# Altium PCB AVP32F2812_EVM_V1.0.PcbDoc (part 1 of 3)
Units mil, origin at the board's own origin, x right, y up, seen from the top; angles counter-clockwise.
Board outline 5669.29 x 3897.64 mil, 2 copper layers (Top Layer, Bottom Layer); 154 components, 189 nets, 732 pads, 469 vias.
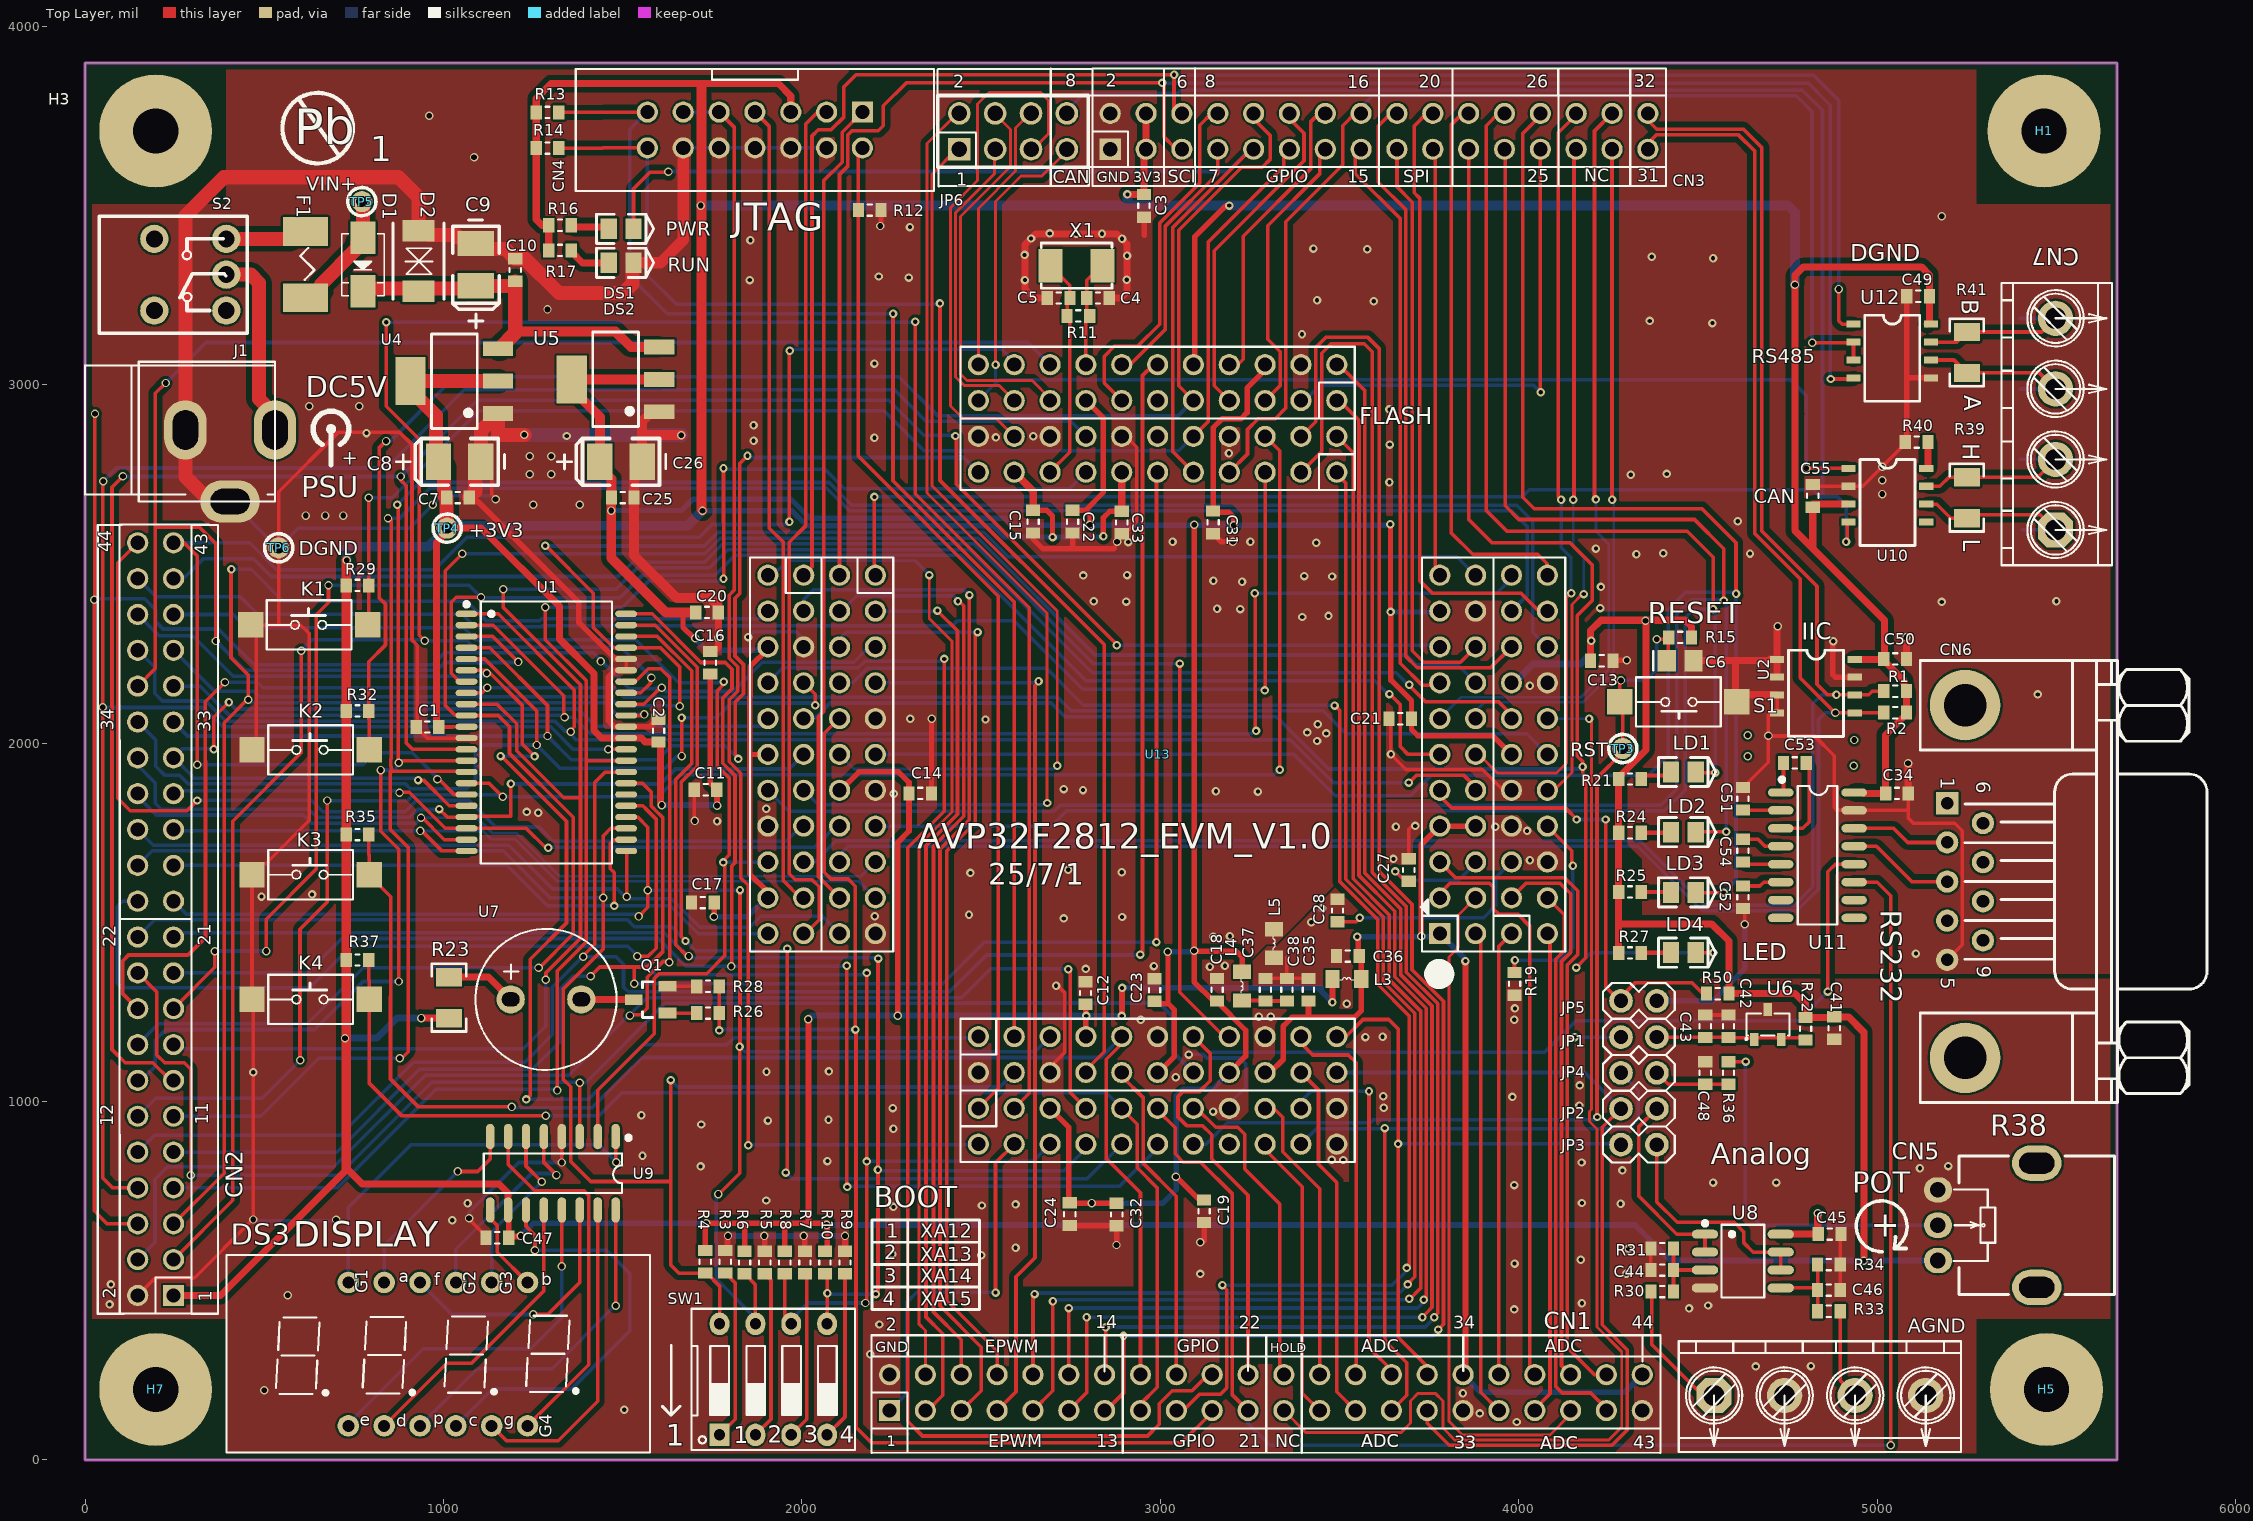
[diagram p0: Top Layer view]
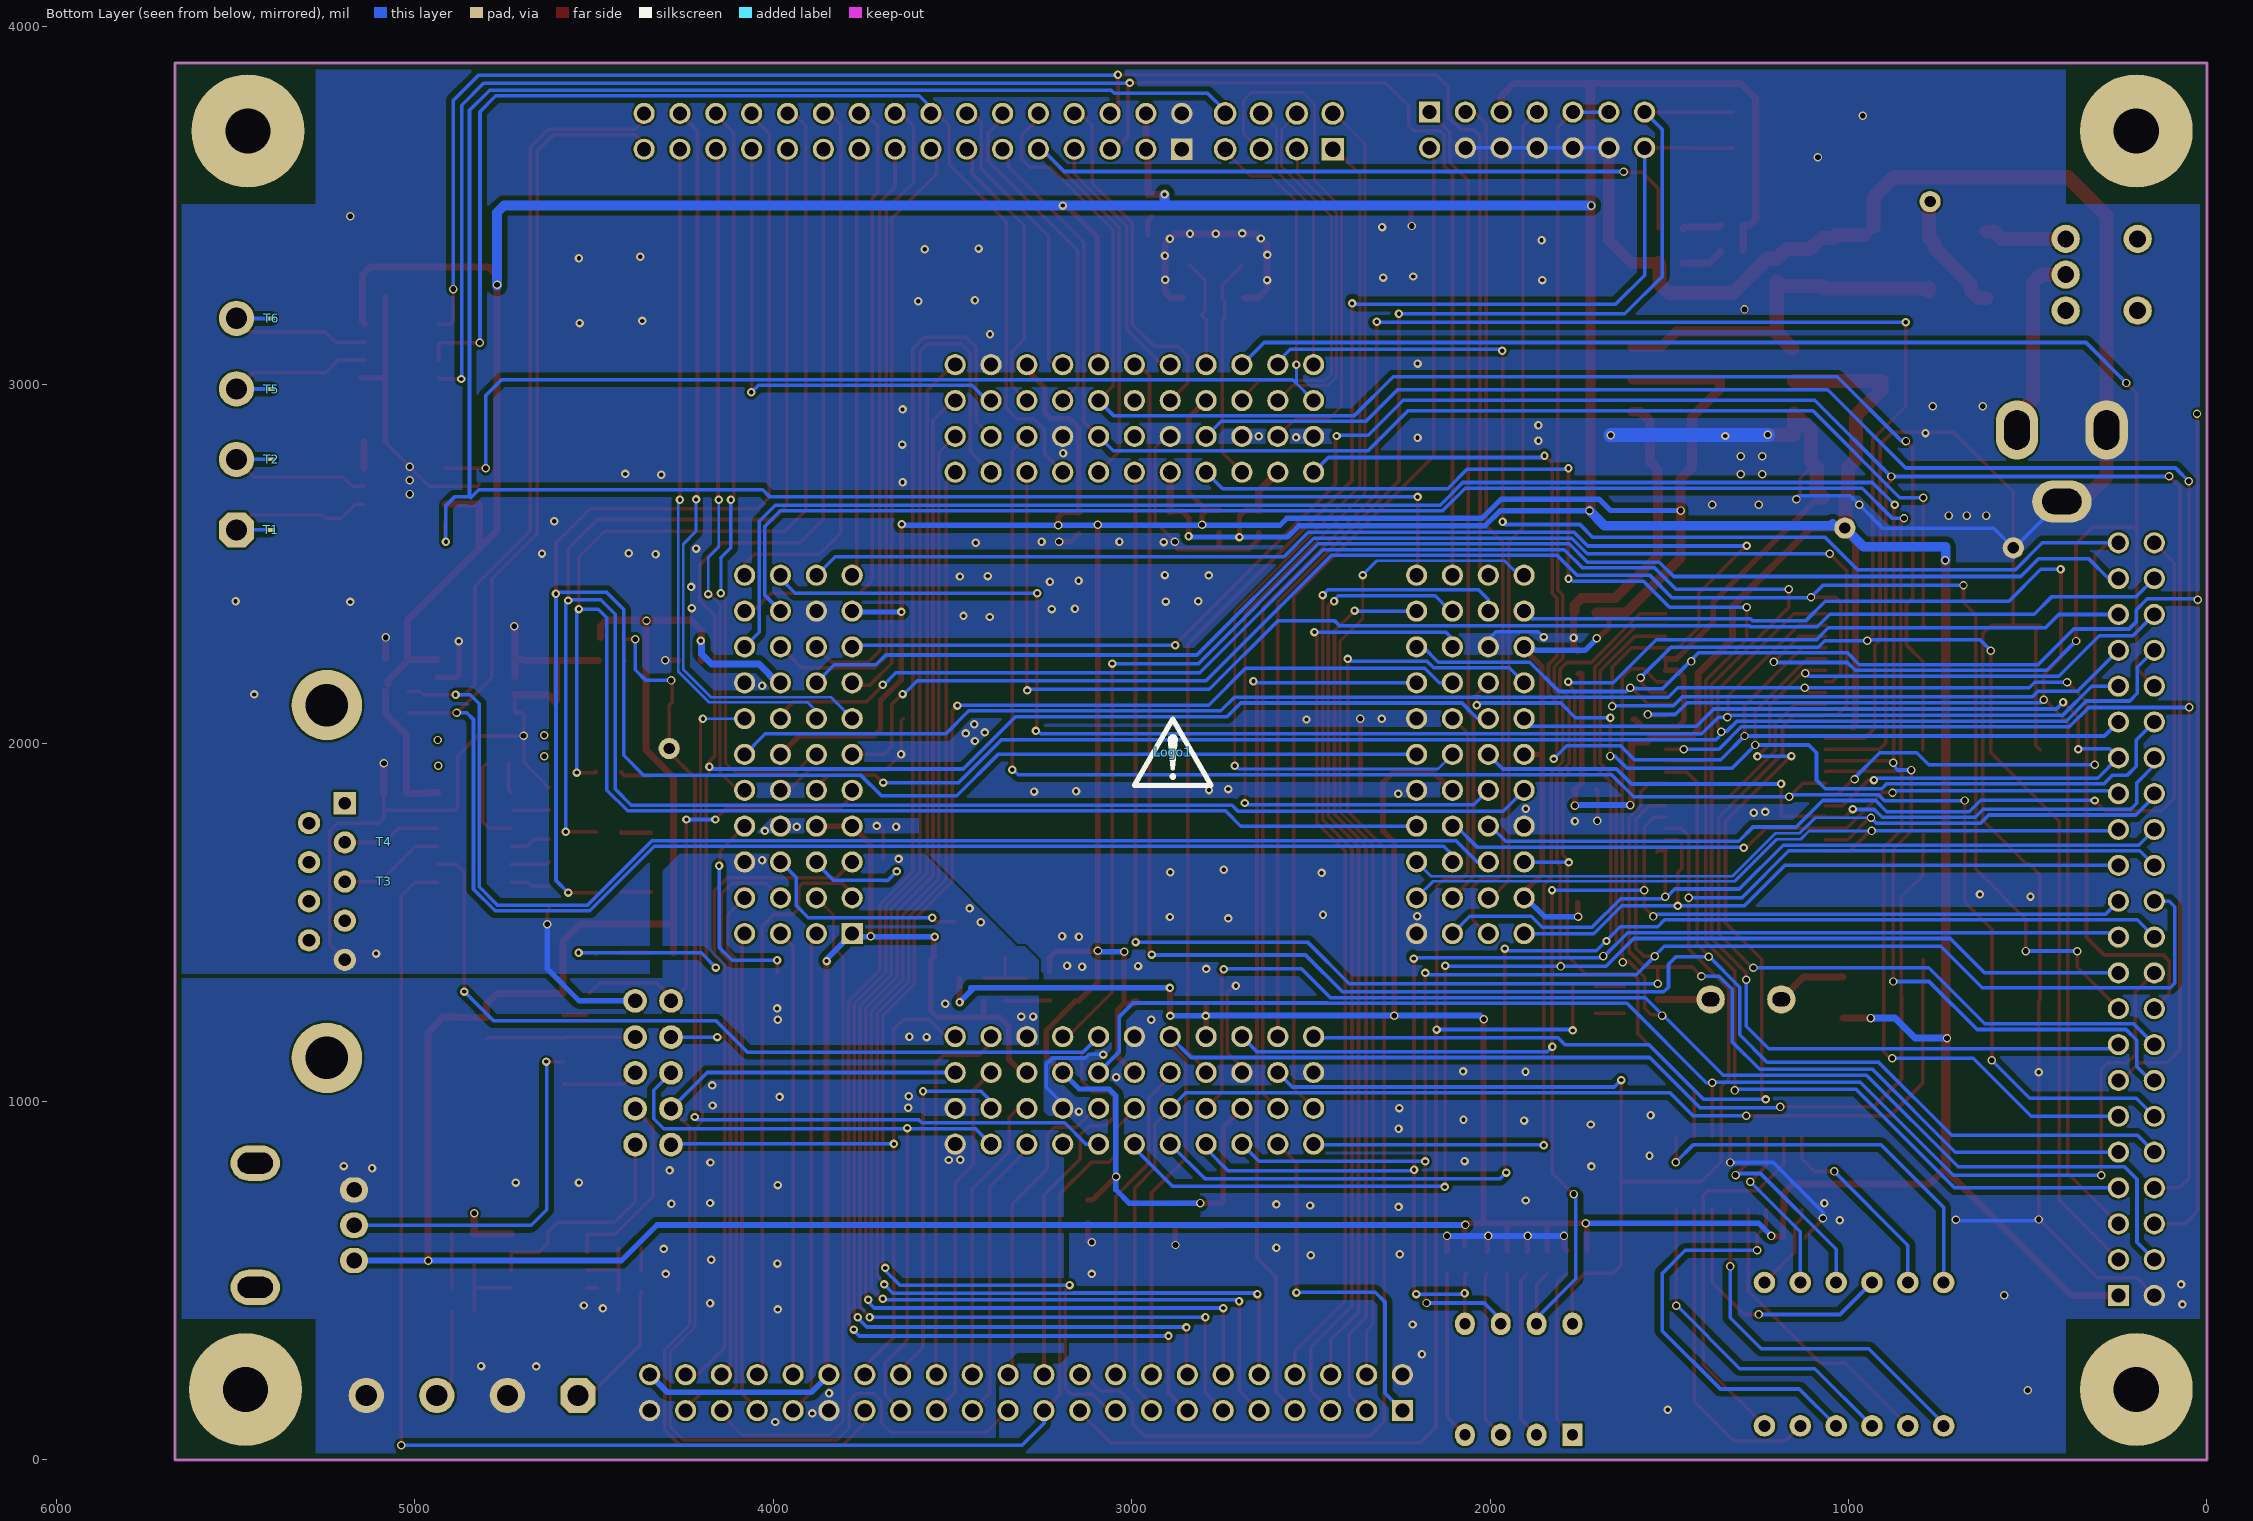
[diagram p1: Bottom Layer view, seen from below]

## Layer stack, top to bottom
Top Solder: solder mask 0.4, Solder Resist, Dk 3.5
Top Layer: signal copper 1.4
Dielectric1: core 12.6, FR-4, Dk 4.8
Bottom Layer: signal copper 1.4
Bottom Solder: solder mask 0.4, Solder Resist, Dk 3.5

## Board outline
0,892.44 0,0 672.44,0 5669.29,0 5669.29,952.44 5669.29,3897.64 4577.44,3897.64 0,3897.64 0,3067.44

## Design rules (kind name [scope] priority, off if disabled: settings)
Clearance [All] p1: gap=6 ignorepadtopadclearanceinfootprint=TRUE except(15: Arc-Fill Arc-Poly Arc-Region Track-Fill Track-Poly Track-Region)
ComponentClearance [All] p1: gap=0 collisioncheckmode=3 verticalgap=0 showdistances=FALSE
FabricationTestPointUsage TestPointUsage [All] p1: valid=0 allowmultiple=FALSE
FabricationTestpoint Testpoint [(IsPad And (OnTopLayer Or OnBottomLayer))] p1: side=3 testpointundercomponent=TRUE minsize=40 maxsize=100 preferedsize=60 minholesize=0 maxholesize=40 preferedholesize=32 testpointgrid=1 allowsidetop=TRUE allowsidebottom=TRUE usegrid=TRUE gridtolerance=0.01
PlaneConnect [All] p1: planeconnectstyle=Direct reliefexpansion=20 reliefentries=4 reliefconductorwidth=10 reliefairgap=10
PolygonConnect PolygonConnect_1 [All vs IsVia] p1: connectstyle=Direct reliefconductorwidth=10 reliefentries=4 polygonreliefangle="90 Angle" airgapwidth=10
PolygonConnect [All] p2: connectstyle=Direct reliefconductorwidth=10 reliefentries=4 polygonreliefangle="90 Angle" airgapwidth=10
RoutingVias [All] p1: holewidth=15.75 width=23.62 viastyle="Through Hole" minholewidth=11.81 minwidth=19.68 maxholewidth=39.37 maxwidth=50
SolderMaskExpansion [All] p1: expansion=4
Width [All] p1: maxlimit=100 minlimit=5 preferedwidth=10
26 further rules are at their usual default settings.

## Classes and differential pairs
component class "4.Communication Interface": C49 C50 C51 C52 C53 C54 C55 CN6 CN7 R39 R40 R41 T1 T2 T3 T4 T5 T6 U10 U11 U12
component class "3.uC Peripheral": C41 C42 C43 C44 C45 C46 C47 C48 CN5 DS3 JP1 JP2 JP3 JP4 K1 K2 K3 K4 LD1 LD2 LD3 LD4 Q1 R21 R22 R23 R24 R25 R26 R27 R28 R29 R30 R31 R32 R33 R34 R35 R36 R37 R38 U6 U7 U8 U9
component class 1.DSP: C1 C2 C3 C4 C5 C6 C27 C28 CN1 CN2 CN3 CN4 DS1 JP5 JP6 R1 R2 R3 R4 R5 R6 R7 R8 R9 R10 R11 R12 R13 R14 R15 R16 R19 R50 S1 SW1 TP3 U1 U2 U13 X1 xxxxxx
component class 2.Power: C7 C8 C9 C10 C11 C12 C13 C14 C15 C16 C17 C18 C19 C20 C21 C22 C23 C24 C25 C26 C31 C32 C33 C34 C35 C36 C37 C38 D1 D2 DS2 F1 H1 H2 H3 H4 H5 H6 H7 H8 J1 L3 L4 L5 Logo1 M1 M2 M3 R17 S2 TP4 TP5 TP6 U4 U5

## Components (designator, comment, footprint, x,y, rotation, side; value= is the part's Value field where it differs from the comment)
C1 "0.1uF/50V" C0603#1 955,2045 r180 top value=0.1uF
C2 "0.1uF/50V" C0603#1 1600,2035 r90 top value=0.1uF
C3 "0.1uF/50V" C0603#1 2954,3499 r270 top value=0.1uF
C4 "22pF/50V" "C0603 - duplicate" 2826,3242 r0 top value=100pF
C5 "22pF/50V" C0603#1 2716,3242 r0 top value=100pF
C6 "0.1uF/50V" C0805 4450,2230 r0 top value=10uF
C7 "0.1uF/50V" C0603#1 1040,2685 r0 top value=0.1uF
C8 "100uF/10V" CASE-B_3528 1045,2785 r180 top
C9 "100uF/10V" CASE-B_3528_1 1090,3335 r270 top
C10 "0.1uF/50V" C0603#1 1200,3320 r90 top value=0.1uF
C11 "0.1uF/50V" C0603#1 1731,1870 r180 top value=0.1uF
C12 "0.1uF/50V" C0603#1 2791,1303 r90 top value=0.1uF
C13 "0.1uF/50V" "C0603 - duplicate" 4231.32,2230 r0 top value=0.1uF
C14 "0.1uF/50V" C0603#1 2330,1860 r0 top value=0.1uF
C15 "0.1uF/50V" C0603#1 2645,2618 r270 top value=0.1uF
C16 "0.1uF/50V" C0603#1 1744,2224.5 r90 top value=0.1uF
C17 "0.1uF/50V" C0603#1 1723.5,1555 r180 top value=0.1uF
C18 "0.1uF/50V" C0603#1 3158,1312 r90 top value=0.1uF
C19 "0.1uF/50V" C0603#1 3122,694 r270 top value=0.1uF
C20 "0.1uF/50V" C0603#1 1735,2365 r0 top value=0.1uF
C21 "0.1uF/50V" C0603#1 3669,2068 r180 top value=0.1uF
C22 "0.1uF/50V" C0603#1 2755,2618 r270 top value=0.1uF
C23 "0.1uF/50V" C0603#1 2984,1311 r90 top value=0.1uF
C24 "0.1uF/50V" C0603#1 2747,686 r270 top value=0.1uF
C25 "0.1uF/50V" C0603#1 1500,2685 r0 top value=0.1uF
C26 "100uF/10V" CASE-B_3528_1 1495,2785 r180 top
C27 "2.2uF/25V" "C0603 - duplicate" 3693,1646 r90 top value=10uF
C28 "2.2uF/25V" "C0603 - duplicate" 3494,1533 r90 top value=10uF
C31 "2.2uF/25V" "C0603 - duplicate" 3147,2616 r270 top value=10uF
C32 "2.2uF/25V" C0603#2 2878,685 r270 top value=0.1uF
C33 "2.2uF/25V" C0603#1 2892,2615.5 r270 top value=10uF
C34 "2.2uF/25V" C0603#2 5055,1860 r0 top value=0.1uF
C35 "2.2uF/25V" C0603#2 3413,1312 r90 top value=10uF
C36 "2.2uF/25V" C0603#2 3523,1406 r180 top value=0.1uF
C37 "2.2uF/25V" C0603#2 3293,1312 r90 top value=10uF
C38 "2.2uF/25V" C0603#2 3353,1312 r90 top value=0.1uF
C41 "0.1uF/50V" C0603#2 4880,1205 r90 top value=1uF
C42 "0.1uF/50V" C0603#2 4585,1210 r270 top value=0.1uF
C43 "0.1uF/50V" C0603#2 4520,1210 r270 top value=10uF
C44 "0.1uF/50V" C0603#2 4400,530 r0 top value=0.1uF
C45 "0.1uF/50V" C0603#2 4867.18,630.19 r180 top value=0.1uF
C46 "0.1uF/50V" "C0603 - duplicate" 4865,474 r180 top value=0.1uF
C47 "0.1uF/50V" C0603#2 1150,620 r180 top value=0.1uF
C48 "0.1uF/50V" C0603#2 4520,1080 r90 top value=0.1uF
C49 "0.1uF/50V" C0603#2 5114,3247 r180 top value=0.1uF
C50 "0.1uF/50V" C0603#2 5050,2235 r0 top value=0.1uF
C51 "0.1uF/50V" C0603#2 4625,1845 r90 top value=0.1uF
C52 "0.1uF/50V" C0603#2 4625,1570 r270 top value=0.1uF
C53 "0.1uF/50V" C0603#2 4770,1945 r0 top value=0.1uF
C54 "0.1uF/50V" C0603#2 4625,1700 r270 top value=0.1uF
C55 "0.1uF/50V" "C0603 - duplicate" 4820,2690 r90 top value=0.1uF
CN1 "2.54-2X22P 排针" IDC2X22 2244.44,138 r0 top
CN2 "2.54-2X22P 排针" IDC2X22 246.61,459.05 r90 top
CN3 "2.54-2X16P 排针" IDC2X16 2860,3657 r0 top
CN4 "2.54-2X7P 简易牛角母座" IDC14-L 1968.5,3710 r180 top value=2.54-2X7P
CN5 "KF301-4P-5.08" J-DG128-4 4840,180 r0 top
CN6 "DB9" db9 5245,1614.17 r0 top
CN7 "KF301-4P-5.08" J-DG128-4 5497.33,2890.06 r90 top
D1 "SS14" SMA 775,3335.2 r90 top
D2 "SMBJ6.8CA" SMB2 930,3345 r270 top
DS1 "LED" SMD_LED0805_LED 1495.55,3435 r180 top
DS2 "黄色LED" SMD_LED0805_LED_1 1495.55,3340 r180 top
DS3 "FJ3461AH" 0.36X4 984.25,295.28 r0 top value=0.36×4
F1 "1.5A/24V" 1812_PTC_NP 615,3335 r270 top
H1 "M3*12+6" "NY PMS 440 0025 PH" 4993.15,3708.23 r0 top
H3 "M3*12+6" "NY PMS 440 0025 PH_1"#1 -275.59,3708.23 r0 top
H5 "M3*12+6" "NY PMS 440 0025 PH" 5000,196.85 r0 top
H7 "M3*12+6" "NY PMS 440 0025 PH_1"#2 196.85,669.29 r90 top
J1 "DC-005-20A" DC-005 529.58,2874.02 r0 top
JP1 "XH2.54-2P" SIP2C_1_1 4335,1180 r180 top
JP2 "XH2.54-2P" SIP2C 4335,980 r180 top
JP3 "XH2.54-2P" SIP2C_1 4335,880 r180 top
JP4 "XH2.54-2P" SIP2C 4335,1080 r180 top
JP5 "XH2.54-2P" SIP2C 4335,1281 r0 top
JP6 "2.54-2X7P 简易牛角母座" HDR-TH_8P-P2.54-V-F-R2-C4-S2.54 2589,3707 r0 top
K1 "1TS002B-2400-5001-CT" SW-3X6 625,2330 r0 top value=1TS002B
K2 "1TS002B-2400-5001-CT" SW-3X6 628.79,1981.24 r0 top value=1TS002B
K3 "1TS002B-2400-5001-CT" SW-3X6 628.79,1633.12 r0 top value=1TS002B
K4 "1TS002B-2400-5001-CT" SW-3X6 628.79,1285 r0 top value=1TS002B
L3 "BLM21PG221SN" L-0805_1_1 3520,1342 r0 top value=220Ω@100MHZ
L4 "BLM21PG221SN" L-0805 3228,1322 r270 top value=220Ω@100MHZ
L5 "BLM21PG221SN" L-0805_1 3317,1441 r270 top value=220Ω@100MHZ
LD1 "Red" SMD_LED0805_LED_1 4459.13,1919.57 r180 top
LD2 "Red" SMD_LED0805_LED 4459.13,1751.59 r180 top
LD3 "Red" SMD_LED0805_LED 4459.13,1583.61 r180 top
LD4 "Red" SMD_LED0805_LED 4459.13,1415.63 r180 top
Logo1 "CAUTION.  READ USER GUIDE BEFORE USE" IEC_Caution_Small 2885,1975 r180 bottom
Q1 "2N7002K" MOS-SOT23 1577.83,1284.17 r90 top
R1 "2.2KΩ" R0603#1 5050,2145 r0 top value=1K
R2 "2.2KΩ" R0603#1 5050,2085 r0 top value=1K
R3 "1KΩ" R0603#1 1786,553 r270 top value=1K
R4 "10KΩ" "R0603 - duplicate" 1730,553 r90 top value=1K
R5 "1KΩ" R0603#1 1896,551 r270 top value=1K
R6 "10KΩ" R0603#1 1840,551 r90 top value=1K
R7 "1KΩ" R0603#1 2008,551 r270 top value=1K
R8 "10KΩ" R0603#1 1952,551 r90 top value=1K
R9 "1KΩ" R0603#1 2120,551 r270 top value=1K
R10 "10KΩ" R0603#1 2064,551 r90 top value=1K
R11 "1MΩ" R0603#2 2771,3192 r180 top value=1K
R12 "2.2KΩ" R0603#2 2189,3487 r180 top value=1K
R13 "10KΩ" R0603#1 1290,3760 r0 top value=1K
R14 "10KΩ" R0603#1 1290,3660 r0 top value=1K
R15 "10KΩ" R0603#1 4450,2295 r180 top value=1K
R16 "10KΩ" R0603#1 1325,3445 r0 top value=1K
R17 "1KΩ" R0603#1 1325,3375 r0 top value=1K
R19 "20K" "R0603 - duplicate" 3988,1328.5 r90 top value=1K
R21 "1KΩ" "R0603 - duplicate" 4310,1900 r180 top value=1K
R22 "470R" R0603#1 4800,1203 r270 top value=1K
R23 "22R" 1206RX 1015,1290 r90 top value=1K
R24 "1KΩ" R0603#2 4310,1750 r180 top value=1K
R25 "1KΩ" R0603#2 4310,1585 r180 top value=1K
R26 "1KΩ" R0603#1 1737.91,1246.77 r0 top value=1K
R27 "1KΩ" R0603#2 4310,1415 r180 top value=1K
R28 "4.7KΩ" "R0603 - duplicate" 1737.91,1321.57 r180 top value=1K
R29 "10KΩ" R0603#2 760,2440 r0 top value=1K
R30 "30KΩ" "R0603 - duplicate" 4400,470 r0 top value=1K
R31 "10KΩ" R0603#2 4400,590 r180 top value=1K
R32 "10KΩ" R0603#1 760,2090 r0 top value=1K
R33 "30KΩ" R0603#1 4865,415 r180 top value=1K
R34 "10KΩ" "R0603 - duplicate" 4865,545 r0 top value=1K
R35 "10KΩ" R0603#1 760,1745 r0 top value=1K
R36 "1KΩ" R0603#1 4585,1080 r270 top value=1K
R37 "10KΩ" R0603#1 760,1395 r0 top value=1K
R38 "RK09K1130A6S  10KΩ" RK09K1130 5445,655 r270 top
R39 "120R" 1206RX 5250,2685 r90 top
R40 "10KΩ" R0603#1 5110,2840 r0 top value=1K
R41 "120R" 1206RX 5250,3090 r90 top value=1K
R50 "10K" R0603#1 4555,1301 r180 top
S1 "1TS002B-2400-5001-CT" SW-3X6 4445,2115 r180 top value=1TS002B
S2 "SMTS-102C3" SW2 393.7,3307.09 r0 top
SW1 "DS-04RP" DIP-KEY-4 1692.05,28.23 r0 top
T1 "SPARK_GAP" SPARK_GAP#1 5380.33,2594.79 r90 bottom locked
T2 "SPARK_GAP" SPARK_GAP#1 5379.33,2791.64 r90 bottom locked
T3 "SPARK_GAP" SPARK_GAP#2 5085,1615 r90 bottom locked
T4 "SPARK_GAP" SPARK_GAP#2 5085,1725 r90 bottom
T5 "SPARK_GAP" SPARK_GAP#1 5379.33,2988 r90 bottom locked
T6 "SPARK_GAP" SPARK_GAP#1 5379.33,3184.85 r90 bottom locked
TP3 "RST" TEST-0.8/1.5MM 4290,1985 r0 top
TP4 "+3V3" TEST-0.8/1.5MM 1010,2600 r0 top
TP5 "VIN+" TEST-0.8/1.5MM 772,3511 r0 top
TP6 "DGND" TEST-0.8/1.5MM 540,2545 r0 top
U1 "IS61LV25616AL-10TLI" TSOP-44_L18.4-W10.2-P0.80-LS11.8-BL 1286.74,2030 r270 top
U2 "AT24C02D-SSHM-T" SO-8 4829,2159 r0 top
U4 "AMS1117-3.3V" SOT-223 1030,3010 r90 top
U5 "AMS1117-1.8V" SOT-223_1 1480,3015 r90 top
U6 "TL431_C963380" SOT-23-3_L2.9-W1.4-P1.90-LS2.6-BR 4695,1215 r270 top
U7 "Cy-9650-3029" SUN-0905-3V 1285.81,1285 r0 top
U8 "LM358_C5252902" SOP-8_L4.9-W3.9-P1.27-LS6.0-BL 4625,555 r270 top
U9 "AIP650" SOIC-16_150mil 1305,800 r180 top
U10 "SN65HVD230D" SO-8 5028.48,2691.8 r0 top
U11 "SP3232EEN" SOIC-16_150mil_1 4833.15,1687.28 r270 top
U12 "SP3485EN-L/TR" SO-8 5042,3094 r0 top
U13 "ADP32F2812" AVP32F335 2992.13,1968.5 r180 top locked
X1 "YSX530GA 10MHZ 20pF 10ppm" XTAL_5032 2766,3332 r0 top value=30MHZ

## Footprints (in the part's own frame and the unit in brackets; to place one, negate y for a bottom-side part, rotate by r counter-clockwise, add the part's x,y. Pads: shape width x height; smd on the part's side, far side on the other; paste and mask are expansions set on the pad)
0.36X4 [mil] "4位0.36寸数码管"
  round 60 hole 33.46: a(-150,200) b(250,200) c(50,-200) com1(-250,200) com2(50,200) com3(150,200) com4(250,-200) d(-150,-200) dp(-50,-200) e(-250,-200) f(-50,200) g(150,-200)
  silkscreen extent -590,-275 592,276, body extent -591,-276 591,276, height 283
1206RX [mm]
  rect 1.3x1.85 smd: 1(-1.45,0) 2(1.45,0)
  silkscreen extent -2.4,-1.21 2.4,1.21, body extent -1.57,-0.8 1.63,0.8, height 0.6
1812_PTC_NP [mil]
  rect 80x125 smd: 1(-92.5,0) 2(92.5,0)
  silkscreen extent -47,-15 42,25, body extent -84,-63 94,63, height 20
AVP32F335 [mm]
  rect 1.5x1.5 hole 1: 1(-20,12.7)
  round 1.5 hole 1: 2(-22.54,12.7) 3(-25.08,12.7) 4(-27.62,12.7) 5(-20,10.16) 6(-22.54,10.16) 7(-25.08,10.16) 8(-27.62,10.16) 9(-20,7.62) 10(-22.54,7.62) 11(-25.08,7.62) 12(-27.62,7.62) 13(-20,5.08) 14(-22.54,5.08) 15(-25.08,5.08) 16(-27.62,5.08) 17(-20,2.54) 18(-22.54,2.54) 19(-25.08,2.54) 20(-27.62,2.54) 21(-20,0) 22(-22.54,0) 23(-25.08,0) 24(-27.62,0) 25(-20,-2.54) 26(-22.54,-2.54) 27(-25.08,-2.54) 28(-27.62,-2.54) 29(-20,-5.08) 30(-22.54,-5.08) 31(-25.08,-5.08) 32(-27.62,-5.08) 33(-20,-7.62) 34(-22.54,-7.62) 35(-25.08,-7.62) 36(-27.62,-7.62) 37(-20,-10.16) 38(-22.54,-10.16) 39(-25.08,-10.16) 40(-27.62,-10.16) 41(-20,-12.7) 42(-22.54,-12.7) 43(-25.08,-12.7) 44(-27.62,-12.7) 45(-12.7,-20) 46(-12.7,-22.54) 47(-12.7,-25.08) 48(-12.7,-27.62) 49(-10.16,-20) 50(-10.16,-22.54) 51(-10.16,-25.08) 52(-10.16,-27.62) 53(-7.62,-20) 54(-7.62,-22.54) 55(-7.62,-25.08) 56(-7.62,-27.62) 57(-5.08,-20) 58(-5.08,-22.54) 59(-5.08,-25.08) 60(-5.08,-27.62) 61(-2.54,-20) 62(-2.54,-22.54) 63(-2.54,-25.08) 64(-2.54,-27.62) 65(0,-20) 66(0,-22.54) 67(0,-25.08) 68(0,-27.62) 69(2.54,-20) 70(2.54,-22.54) 71(2.54,-25.08) 72(2.54,-27.62) 73(5.08,-20) 74(5.08,-22.54) 75(5.08,-25.08) 76(5.08,-27.62) 77(7.62,-20) 78(7.62,-22.54) 79(7.62,-25.08) 80(7.62,-27.62) 81(10.16,-20) 82(10.16,-22.54) 83(10.16,-25.08) 84(10.16,-27.62) 85(12.7,-20) 86(12.7,-22.54) 87(12.7,-25.08) 88(12.7,-27.62) 89(20,-12.7) 90(22.54,-12.7) 91(25.08,-12.7) 92(27.62,-12.7) 93(20,-10.16) 94(22.54,-10.16) 95(25.08,-10.16) 96(27.62,-10.16) 97(20,-7.62) 98(22.54,-7.62) 99(25.08,-7.62) 100(27.62,-7.62) 101(20,-5.08) 102(22.54,-5.08) 103(25.08,-5.08) 104(27.62,-5.08) 105(20,-2.54) 106(22.54,-2.54) 107(25.08,-2.54) 108(27.62,-2.54) 109(20,0) 110(22.54,0) 111(25.08,0) 112(27.62,0) 113(20,2.54) 114(22.54,2.54) 115(25.08,2.54) 116(27.62,2.54) 117(20,5.08) 118(22.54,5.08) 119(25.08,5.08) 120(27.62,5.08) 121(20,7.62) 122(22.54,7.62) 123(25.08,7.62) 124(27.62,7.62) 125(20,10.16) 126(22.54,10.16) 127(25.08,10.16) 128(27.62,10.16) 129(20,12.7) 130(22.54,12.7) 131(25.08,12.7) 132(27.62,12.7) 133(12.7,20) 134(12.7,22.54) 135(12.7,25.08) 136(12.7,27.62) 137(10.16,20) 138(10.16,22.54) 139(10.16,25.08) 140(10.16,27.62) 141(7.62,20) 142(7.62,22.54) 143(7.62,25.08) 144(7.62,27.62) 145(5.08,20) 146(5.08,22.54) 147(5.08,25.08) 148(5.08,27.62) 149(2.54,20) 150(2.54,22.54) 151(2.54,25.08) 152(2.54,27.62) 153(0,20) 154(0,22.54) 155(0,25.08) 156(0,27.62) 157(-2.54,20) 158(-2.54,22.54) 159(-2.54,25.08) 160(-2.54,27.62) 161(-5.08,20) 162(-5.08,22.54) 163(-5.08,25.08) 164(-5.08,27.62) 165(-7.62,20) 166(-7.62,22.54) 167(-7.62,25.08) 168(-7.62,27.62) 169(-10.16,20) 170(-10.16,22.54) 171(-10.16,25.08) 172(-10.16,27.62) 173(-12.7,20) 174(-12.7,22.54) 175(-12.7,25.08) 176(-12.7,27.62)
  silkscreen extent -28.89,-28.89 28.89,28.89
C0603#1 [mm] "无丝印       D=1.6"
  rect 0.8x1 smd mask+0.051: 1(-0.8,0) 2(0.8,0)
  silkscreen extent -0.15,-0.4 0.15,0.4, body extent -0.71,-0.38 0.81,0.38, height 0.68
C0603#2 [mm] "无丝印       D=1.6"
  rect 0.8x1 smd: 1(-0.8,0) 2(0.8,0)
  silkscreen extent -0.15,-0.4 0.15,0.4, body extent -0.71,-0.38 0.81,0.38, height 0.68
"C0603 - duplicate" [mm] "无丝印       D=1.6"
  rect 0.8x1 smd mask+0.051: 1(-0.8,0) 2(0.8,0)
  silkscreen extent -0.15,-0.4 0.15,0.4, body extent -0.71,-0.38 0.81,0.38, height 0.68
C0805 [mm] "Chip Capacitor; Body 2.0 x 1.2 mm (LxW typ)"
  rect 1.3x1.5 smd: 1(-0.95,0) 2(0.95,0)
  silkscreen extent -1.9,-0.65 -1.9,0.65
CASE-B_3528 [mm]
  rect 1.8x2.6 smd: 1(1.5,0) 2(-1.5,0)
  silkscreen extent -3.18,-1.65 4.5,1.65, body extent -1.85,-1.47 1.85,1.46, height 2.03
CASE-B_3528_1 [mm]
  rect 1.8x2.6 smd: 1(1.5,0) 2(-1.5,0)
  silkscreen extent -3.18,-1.65 4.5,1.65, body extent -1.85,-1.47 1.85,1.46, height 2.03
db9 [mil]
  round 196.67 hole 118.33: 0(0,-492.08) 0(0,492.08)
  rect 62x62 hole 35: 1(-50,217.92)
  round 62 hole 35: 2(-50,108.75) 3(-50,-0.42) 4(-50,-109.58) 5(-50,-218.75) 6(50,162.92) 7(50,53.75) 8(50,-55.42) 9(50,-164.58)
  silkscreen extent -125,-617 675,616, body extent -108,-601 550,600, height 124
DC-005 [mm] "接口大小9X11MM    5.5-2.1mm  孔径1.8/2.8"
  oval 3x4.2 hole 1.8 slot 2.8 at 90 deg: 1(0,0) 3(-6.35,0)
  oval 4.2x3 hole 1.8 slot 2.8 at 0 deg: 2(-3.175,-5.08)
  silkscreen extent -13.46,-5.08 0,4.83, body extent -13.7,-5.02 0.45,4.56, height 11
DIP-KEY-4 [mm]
  rect 1.4x1.6 hole 0.8: 1(1.98,1.065)
  oval 1.4x1.6 hole 0.8: 2(4.52,1.065) 3(7.06,1.065) 4(9.6,1.065) 5(9.6,8.935) 6(7.06,8.935) 7(4.52,8.935) 8(1.98,8.935)
  silkscreen extent 0,0 11.58,10, body extent -0.05,-0.08 6.55,10.08, height 6.9
HDR-TH_8P-P2.54-V-F-R2-C4-S2.54 [mm]
  rect 1.6x1.6 hole 1.1: 1(-3.81,-1.27)
  round 1.6 hole 1.1: 2(-3.81,1.27) 3(-1.27,-1.27) 4(-1.27,1.27) 5(1.27,-1.27) 6(1.27,1.27) 7(3.81,-1.27) 8(3.81,1.27)
  silkscreen extent -5.33,-2.54 5.33,2.54
IDC2X16 [mm] "2.54X40P双排插针"
  rect 1.5x1.5 hole 1: 1(0,0)
  round 1.5 hole 1: 2(0,2.54) 3(2.54,0) 4(2.54,2.54) 5(5.08,0) 6(5.08,2.54) 7(7.62,0) 8(7.62,2.54) 9(10.16,0) 10(10.16,2.54) 11(12.7,0) 12(12.7,2.54) 13(15.24,0) 14(15.24,2.54) 15(17.78,0) 16(17.78,2.54) 17(20.32,0) 18(20.32,2.54) 19(22.86,0) 20(22.86,2.54) 21(25.4,0) 22(25.4,2.54) 23(27.94,0) 24(27.94,2.54) 25(30.48,0) 26(30.48,2.54) 27(33.02,0) 28(33.02,2.54) 29(35.56,0) 30(35.56,2.54) 31(38.1,0) 32(38.1,2.54)
  silkscreen extent -1.27,-1.27 39.4,3.82, body extent -1.23,-1.23 39.4,3.82, height 8.4
IDC2X22 [mm] "2.54X40P双排插针"
  rect 1.5x1.5 hole 1: 1(0,0)
  round 1.5 hole 1: 2(0,2.54) 3(2.54,0) 4(2.54,2.54) 5(5.08,0) 6(5.08,2.54) 7(7.62,0) 8(7.62,2.54) 9(10.16,0) 10(10.16,2.54) 11(12.7,0) 12(12.7,2.54) 13(15.24,0) 14(15.24,2.54) 15(17.78,0) 16(17.78,2.54) 17(20.32,0) 18(20.32,2.54) 19(22.86,0) 20(22.86,2.54) 21(25.4,0) 22(25.4,2.54) 23(27.94,0) 24(27.94,2.54) 25(30.48,0) 26(30.48,2.54) 27(33.02,0) 28(33.02,2.54) 29(35.56,0) 30(35.56,2.54) 31(38.1,0) 32(38.1,2.54) 33(40.64,0) 34(40.64,2.54) 35(43.18,0) 36(43.18,2.54) 37(45.72,0) 38(45.72,2.54) 39(48.26,0) 40(48.26,2.54) 41(50.8,0) 42(50.8,2.54) 43(53.34,0) 44(53.34,2.54)
  silkscreen extent -1.27,-1.27 54.64,3.82, body extent -1.23,-1.23 54.69,3.85, height 8.4
IDC14-L [mm]
  rect 1.5x1.5 hole 1: 1(-5.084,-1.29)
  round 1.5 hole 1: 2(-5.084,1.25) 3(-2.544,-1.29) 4(-2.544,1.25) 5(-0.004,-1.29) 6(-0.004,1.25) 7(2.536,-1.29) 8(2.536,1.25) 9(5.076,-1.29) 10(5.076,1.25) 11(7.616,-1.29) 12(7.616,1.25) 13(10.156,-1.29) 14(10.156,1.25)
  silkscreen extent -10.16,-4.34 15.24,4.3, body extent -10.18,-4.47 15.26,4.65, height 9.1
IEC_Caution_Small [mil]
  silkscreen extent -107,-93 107,92
J-DG128-4 [mm]
  oct 2.5x2.5 hole 1.5: 1(-7.5,0)
  round 2.5 hole 1.5: 2(-2.5,0) 3(2.5,0) 4(7.5,0)
  silkscreen extent -10,-4 10,3.84, body extent -10,-3.59 10,3.91, height 10
L-0805 [mil] "标准型  间距40mil 电感"
  rect 40x50 smd: 1(-40,0) 2(40,0)
  silkscreen extent -20,-3 19,3, body extent -39,-26 39,24, height 36
L-0805_1 [mil] "标准型  间距40mil 电感"
  rect 40x50 smd: 1(-40,0) 2(40,0)
  silkscreen extent -20,-3 19,3, body extent -39,-26 39,24, height 36
L-0805_1_1 [mil] "标准型  间距40mil 电感"
  rect 40x50 smd: 1(-40,0) 2(40,0)
  silkscreen extent -20,-3 19,3, body extent -39,-26 39,24, height 36
MOS-SOT23 [mm] "焊盘加长型"
  rect 0.762x1.27 smd: D(0,1.2) G(-0.95,-1.2) S(0.95,-1.2)
  silkscreen extent -1.27,-0.15 1.27,0.58, body extent -1.45,-1.5 1.45,1.3, height 1.2
"NY PMS 440 0025 PH" [mm] "4-40 nylon screw and mounting hole"
  round 8 hole 3.2: 1(12,0)
"NY PMS 440 0025 PH_1"#1 [mm] "4-40 nylon screw and mounting hole"
  round 8 hole 3.2: 1(12,0)
"NY PMS 440 0025 PH_1"#2 [mm] "4-40 nylon screw and mounting hole"
  round 8 hole 3.2: 1(-12,0)
R0603#1 [mm] "无丝印 脚距1.6mm  0.8/1mm 焊盘"
  rect 0.8x1 smd mask+0.051: 1(-0.8,0) 2(0.8,0)
  silkscreen extent -0.15,-0.4 0.15,0.4, body extent -0.79,-0.4 0.81,0.4, height 0.43
R0603#2 [mm] "无丝印 脚距1.6mm  0.8/1mm 焊盘"
  rect 0.8x1 smd: 1(-0.8,0) 2(0.8,0)
  silkscreen extent -0.15,-0.4 0.15,0.4, body extent -0.79,-0.4 0.81,0.4, height 0.43
"R0603 - duplicate" [mm] "无丝印 脚距1.6mm  0.8/1mm 焊盘"
  rect 0.8x1 smd mask+0.051: 1(-0.8,0) 2(0.8,0)
  silkscreen extent -0.15,-0.4 0.15,0.4, body extent -0.79,-0.4 0.81,0.4, height 0.43
RK09K1130 [mm] "立式可调电位器"
  oval 2.5x3.5 hole 1.5 slot 2.5 at 90 deg: 0(-4.4,0) 0(4.4,0)
  oval 1.8x2 hole 1.1: 1(-2.5,-7) 2(0,-7) 3(2.5,-7)
  silkscreen extent -4.9,-5.88 4.9,5.5, body extent -5.7,-7.15 5.7,5.5, height 19.5
SIP2C [mil] "带短路帽"
  round 66 hole 40 paste-4: 1(-50,0) 2(50,0)
  silkscreen extent -100,-50 100,50, body extent -100,-52 100,50, height 344
SIP2C_1 [mil] "带短路帽"
  round 66 hole 40: 1(-50,0) 2(50,0)
  silkscreen extent -100,-50 100,50, body extent -100,-52 100,50, height 344
SIP2C_1_1 [mil] "带短路帽"
  round 66 hole 40 paste-4: 1(-50,0) 2(50,0)
  silkscreen extent -100,-50 100,50, body extent -100,-52 100,50, height 344
SMA [mm] "DO-214AC"
  rect 2.3x1.75 smd: 1(1.9,0) 2(-1.9,0)
  silkscreen extent -2.2,-1.5 2.2,1.5, body extent -2.3,-1.37 2.3,1.33, height 2.4
SMB2 [mm] "双向TVS"
  rect 1.52x2.3 smd: 1(-2.14,0) 2(2.14,0)
  silkscreen extent -2.7,-1.8 2.7,1.8, body extent -2.7,-1.8 2.7,1.8, height 2.3
SMD_LED0805_LED [mm]
  rect 1.16x1.47 smd: 1(0.875,0) 2(-0.875,0)
  silkscreen extent -2.3,-1.04 1.76,1.03, body extent -1.01,-0.62 1.01,0.62, height 1.1
SMD_LED0805_LED_1 [mm]
  rect 1.16x1.47 smd: 1(0.875,0) 2(-0.875,0)
  silkscreen extent -2.3,-1.04 1.76,1.03, body extent -1.01,-0.62 1.01,0.62, height 1.1
SO-8 [mm]
  rect 1x0.5 smd: 1(-2.75,1.905) 2(-2.75,0.635) 3(-2.75,-0.635) 4(-2.75,-1.905) 5(2.75,-1.905) 6(2.75,-0.635) 7(2.75,0.635) 8(2.75,1.905)
  silkscreen extent -1.95,-3.56 1.95,2.54
SOIC-16_150mil [mm]
  oval 0.6x1.8 smd: 1(-4.445,-2.6) 2(-3.175,-2.6) 3(-1.905,-2.6) 4(-0.635,-2.6) 5(0.635,-2.6) 6(1.905,-2.6) 7(3.175,-2.6) 8(4.445,-2.6) 9(4.445,2.6) 10(3.175,2.6) 11(1.905,2.6) 12(0.635,2.6) 13(-0.635,2.6) 14(-1.905,2.6) 15(-3.175,2.6) 16(-4.445,2.6)
  silkscreen extent -5.51,-2.66 4.9,1.4, body extent -5,-2.8 4.98,3.11, height 1.45
SOIC-16_150mil_1 [mm]
  oval 0.6x1.8 smd: 1(-4.445,-2.6) 2(-3.175,-2.6) 3(-1.905,-2.6) 4(-0.635,-2.6) 5(0.635,-2.6) 6(1.905,-2.6) 7(3.175,-2.6) 8(4.445,-2.6) 9(4.445,2.6) 10(3.175,2.6) 11(1.905,2.6) 12(0.635,2.6) 13(-0.635,2.6) 14(-1.905,2.6) 15(-3.175,2.6) 16(-4.445,2.6)
  silkscreen extent -5.51,-2.66 4.9,1.4, body extent -5,-2.8 4.98,3.11, height 1.45
SOP-8_L4.9-W3.9-P1.27-LS6.0-BL [mm]
  oval 0.63x1.865 smd: 1(-1.905,-2.682) 2(-0.635,-2.682) 3(0.635,-2.682) 4(1.905,-2.682) 5(1.905,2.683) 6(0.635,2.683) 7(-0.635,2.683) 8(-1.905,2.683)
  silkscreen extent -2.82,-2.83 2.58,1.52
SOT-23-3_L2.9-W1.4-P1.90-LS2.6-BR [mm]
  rect 0.91x0.6 smd: 1(1.055,-0.955) 2(1.055,0.955) 3(-1.055,0)
  silkscreen extent -0.78,-1.6 1.09,1.53
SOT-223 [mm] "SOT-223/SC-73; 4 Leads; Body 6.7 x 7.3 mm, inc. leads (LxW max)"
  rect 1.05x2.15 smd: 1(-2.3,-3.1) 2(0,-3.1) 3(2.3,-3.1)
  rect 3.4x2.15 smd: 2(0,3.1)
  silkscreen extent -3.35,-1.63 3.35,1.63, body extent -3.3,-3.5 3.4,3.71, height 1.85
SOT-223_1 [mm] "SOT-223/SC-73; 4 Leads; Body 6.7 x 7.3 mm, inc. leads (LxW max)"
  rect 1.05x2.15 smd: 1(-2.3,-3.1) 2(0,-3.1) 3(2.3,-3.1)
  rect 3.4x2.15 smd: 2(0,3.1)
  silkscreen extent -3.35,-1.63 3.35,1.63, body extent -3.3,-3.5 3.4,3.71, height 1.85
SPARK_GAP#1 [mil] "无Paste层"
  rect 10x20 smd paste-39.37: 1(0,20)
SPARK_GAP#2 [mil] "无Paste层"
SUN-0905-3V [mm] "蜂鸣器/9.6*5 有源 3V 电磁蜂鸣器"
  round 2 hole 1 slot 1.25 at 0 deg: 1(-2.5,0) 2(2.5,0)
  silkscreen extent -5,-5 5,5, body extent -4.99,-5 5,5, height 6.05
SW2 [mm] "扭子开关单刀无复位无中点"
  round 2 hole 1.2: 0(-5.1,-2.54) 0(-5.1,2.54) 1(0,-2.54) 2(0,0) 3(0,2.54)
  silkscreen extent -9,-4.15 1.5,4.15, body extent -26.1,-4.11 0.7,4.01, height 5.96
SW-3X6 [mm] "立创商城 轻触开关 3X6 鸿源精密"
  rect 1.8x1.8 smd mask+0.05: 1(4.15,0) 2(-4.15,0)
  silkscreen extent -3,-1.75 3,1.75, body extent -2.95,-1.75 2.95,1.75, height 4
TEST-0.8/1.5MM [mm]
  round 1.5 hole 0.8: 1(0,0)
  silkscreen extent -1,-1 1,1
TSOP-44_L18.4-W10.2-P0.80-LS11.8-BL [mm]
  oval 0.448x1.551 smd: 1(-8.4,-5.656) 2(-7.6,-5.656) 3(-6.8,-5.656) 4(-6,-5.656) 5(-5.2,-5.656) 6(-4.4,-5.656) 7(-3.6,-5.656) 8(-2.8,-5.656) 9(-2,-5.656) 10(-1.2,-5.656) 11(-0.4,-5.656) 12(0.4,-5.656) 13(1.2,-5.656) 14(2,-5.656) 15(2.8,-5.656) 16(3.6,-5.656) 17(4.4,-5.656) 18(5.2,-5.656) 19(6,-5.656) 20(6.8,-5.656) 21(7.6,-5.656) 22(8.4,-5.656) 23(8.4,5.656) 24(7.6,5.656) 25(6.8,5.656) 26(6,5.656) 27(5.2,5.656) 28(4.4,5.656) 29(3.6,5.656) 30(2.8,5.656) 31(2,5.656) 32(1.2,5.656) 33(0.4,5.656) 34(-0.4,5.656) 35(-1.2,5.656) 36(-2,5.656) 37(-2.8,5.656) 38(-3.6,5.656) 39(-4.4,5.656) 40(-5.2,5.656) 41(-6,5.656) 42(-6.8,5.656) 43(-7.6,5.656) 44(-8.4,5.656)
  silkscreen extent -9.28,-5.81 9.28,4.65
XTAL_5032 [mm] "5032晶振"
  rect 1.7x2.4 smd: 1(-1.85,0) 2(1.85,0)
  silkscreen extent -2.5,-1.6 2.5,1.6, body extent -2.53,-1.55 2.47,1.65, height 1.3

## Part data
C1 C2 C3 C6 C7 C10 C11 C12 C13 C14 C15 C16 C17 C18 C19 C20 C21 C22 C23 C24 C25 C27 C28 C31 C32 C33 C34 C35 C36 C37 C38 C41 C42 C43 C44 C45 C46 C47 C48 C49 C50 C51 C52 C53 C54 C55: library part Cap, "贴片电容", LatestRevisionDate=17-Jul-2002, LatestRevisionNote="Re-released for DXP Platform.", Published=8-Jun-2000, Publisher="Altium Limited"
C4 C5: library part Cap, "COG贴片电容", LatestRevisionDate=17-Jul-2002, LatestRevisionNote="Re-released for DXP Platform.", Published=8-Jun-2000, Publisher="Altium Limited"
C8 C9 C26: library part CAP2, "钽电容", Tolerance error=10%, Brand Name=三星, cost=￥0.01
CN1 CN2: library part "CON 22X2A", "连接器"
CN3: library part "CON 16X2A", "连接器"
CN4 JP6: library part Receptacle_7X2, "连接器"
CN5 CN7: library part CON4, "连接器"
CN6: library part "D Connector 9", "DB9插座", PackageDocument=O, DatasheetDocument=1-Sep-1999, Gender=Receptacle, LatestRevisionDate=17-Jul-2002, LatestRevisionNote="Re-released for DXP Platform.", Orientation="Right Angle", PackageReference=788750, Positions=9, Published=15-Jun-2001, Publisher="Altium Limited"
D1: library part "D Schottky", "肖特基二极管", Code_JEDEC=DO-214-AA, LatestRevisionDate=17-Jul-2002, LatestRevisionNote="Re-released for DXP Platform.", Published=8-Jun-2000, Publisher="Altium Limited"
D2: library part TVS, "TVS二极管", LatestRevisionDate=17-Jul-2002, LatestRevisionNote="Re-released for DXP Platform.", Published=8-Jun-2000, Publisher="Altium Limited"
DS1 DS2 LD1 LD2 LD3 LD4: library part LED0, "发光二极管", LatestRevisionDate=08-Jul-2005, LatestRevisionNote="Mech Layer 1 removed.", PackageDescription="LED; 2 Leads", PackageReference=LED-0, Published=8-Jun-2000, Publisher="Altium Limited"
DS3: library part "Dpy Amber-4K", "4位0.36英寸红色共阴七段数码管", Pin=12, 焊接类型=直插
F1: library part "Fuse Thermal", "自恢复保险丝", LatestRevisionDate=17-Jul-2002, LatestRevisionNote="Re-released for DXP Platform.", PackageReference=PIN-W2/E2.8, Published=24-Mar-1999, Publisher="Altium Limited"
H1 H3 H5 H7: library part CMP-0003617-1, "安装孔"
J1: library part DC-005, "DC电源接口，内径2.1mm", LatestRevisionDate=17-Jul-2002, LatestRevisionNote="Re-released for DXP Platform.", Published=24-Mar-1999, Publisher="Altium Limited"
JP1 JP2 JP3 JP4 JP5: library part JP2, "连接器+跳线帽"
K1 K2 K3 K4 S1: library part SW-PB, "鸿源精密轻触开关3X6", LatestRevisionDate=17-Jul-2002, LatestRevisionNote="Re-released for DXP Platform.", Published=24-Mar-1999, Publisher="Altium Limited"
L3 L4 L5: library part FB1, "贴片电感", Code_IEC=1005, Code_JEITA=0402, LatestRevisionDate=29-May-2009, LatestRevisionNote="IPC-7351 Footprint Added.", PackageDescription="Chip Inductor", PackageReference=0402-A, Published=8-Jun-2000, Publisher="Altium Limited"
Logo1: library part CMP-0074836-1, "IEC 61010-1 Caution Warning"
Q1: library part 2SK3019, "N-MOSFET 60V300mA低开启电压", LatestRevisionDate=17-Jul-2002, LatestRevisionNote="Re-released for DXP Platform.", Published=8-Jun-2000, Publisher="Altium Limited"
R1 R2 R3 R4 R5 R6 R7 R8 R9 R10 R11 R12 R13 R14 R15 R16 R17 R19 R21 R22 R23 R24 R25 R26 R27 R28 R29 R30 R31 R32 R33 R34 R35 R36 R37 R39 R40 R41 R50: library part Res, "贴片电阻", LatestRevisionDate=17-Jul-2002, LatestRevisionNote="Re-released for DXP Platform.", Published=8-Jun-2000, Publisher="Altium Limited"
R38: library part "RPot SM", "立式可调电位器", DatasheetDocument=Oct-2003, Published=17-Dec-2003, Publisher="Altium Limited"
S2: library part SW-SPDT, "红色卧式弯脚小型扭子开关5脚2档", DatasheetDocument=05-Dec-2000, LatestRevisionDate=17-Dec-2003, LatestRevisionNote="Schematic revised, PCB Footprint replaced.", Published=24-Mar-1999, Publisher="Altium Limited"
SW1: library part SW-4B, "红色2PIN-2.54mm立式直插正拨拨码开关", LatestRevisionDate=17-Jul-2002, LatestRevisionNote="Re-released for DXP Platform.", Published=24-Mar-1999, Publisher="Altium Limited"
T1 T2 T3 T4 T5 T6: library part "GND SIDE", "静电GAP"
TP3 TP4 TP5 TP6: library part TP, "测试点"
U1: "无锡中微LED驱动芯片"
U2: library part AT24C02C, "EEPROM存储器"
U4 U5: library part ASM1117-3.3V, "线性稳压器"
U6: Input Voltage=37V, JLCPCB Part Class="Extended Part", Manufacturer Part=TL431, Minimum Cathode Current for Regulation=1mA, Output Current=-, Output Voltage=2.5V~36V, Add into BOM=yes, Convert to PCB=yes, Device=TL431_C963380, Name=TL431, Noise - 1/10Hz to 10Hz=-, Noise - 10Hz to 10kHz=-, Supplier=LCSC, Supplier Footprint=SOT-23, Supplier Part=C963380, Supply Current=-, Symbol=TL431_C963380, Tolerance=-
U7: library part BEEP, "超音V有源蜂鸣器 电磁式 脚距5,外径9.5mm"
U8: JLCPCB Part Class="Extended Part", Manufacturer Part=LM358, Voltage - Input Offset(Vos)=5mV, Add into BOM=yes, Convert to PCB=yes, Datasheet=https://atta.szlcsc.com/upload/public/pdf/source/20221111/EFA130B3B4599AE68A453AC9B85C4BC9.pdf, Device=LM358_C5252902, Gain Bandwidth Product(GBP)=1.2MHz, Name=LM358, Number of Circuits=2, Supplier=LCSC, Supplier Footprint=SOP-8, Supplier Part=C5252902, Symbol=LM358_C5252902
U9: library part AIP650E, "无锡中微LED驱动芯片"
U10: "3.3V CANͨѶ"
U11: library part MAX232, "低压232通讯芯片"
U12: library part SP3485E, "3.3V 485总线收发器"
U13: Mfr_Name="Texas Instruments", RefDes=RefDes, Type=Type
X1: library part XTAL, "5032贴片无源晶振", LatestRevisionDate=17-Jul-2002, LatestRevisionNote="Re-released for DXP Platform.", Published=8-Jun-2000, Publisher="Altium Limited"

## Via types
v1: diameter 23.62, hole 11.81, Top Layer to Bottom Layer, tented both sides, 308 vias
v2: diameter 23.62, hole 15.75, Top Layer to Bottom Layer, 161 vias

## Nets (pads, with @x,y where several pads share a name; then routed paths per layer and width w, separated by ;. In a path a pad name is that pad's centre, name@x,y a point inside that pad or via, vN(x,y) a via of type N, cw(c..) or ccw(c..) an arc to the next point about the centre after c; other vN are vias at no path point)
2.5VREF: C42.2 C43.2 JP1.1 R22.2 U6.1 U6.2 | length 417.1
  Top Layer w10: JP1.1@4385,1180 C42.2@4585,1180 ; C42.2@4585,1178.5 4795,1178.5 R22.2@4800,1173.5
485-A: CN7.3 R41.1 T5.1 U12.6 | length 489.6
  Top Layer w10: U12.6@5139.27,3069 U12.6@5150.27,3069 5213.91,3069 R41.1@5250,3032.91 5452.9,3032.91 CN7.3@5497.33,2988.49
  Bottom Layer w10: T5.1@5399.33,2988 5447.44,2988 5447.93,2988.49 CN7.3@5497.33,2988.49
485-B: CN7.4 R41.2 T6.1 U12.7 | length 483.7
  Top Layer w10: U12.7@5139.27,3119 U12.7@5150.27,3119 5221.91,3119 R41.2@5250,3147.09 5459.08,3147.09 CN7.4@5497.33,3185.34
  Bottom Layer w10: T6.1@5399.33,3184.85 5447.44,3184.85 5447.93,3185.34 CN7.4@5497.33,3185.34
+5VDC: D1.1 F1.2 TP5.1 | length 339.8
  Top Layer w39.37: F1.2@615,3242.5 637.5,3242.5 657.82,3262.81 657.82,3279.82 760.24,3382.24 760.24,3395.24 D1.1@775,3410 TP5.1@775,3502.84
A: DS3.a U9.8 | length 561.8
  Top Layer w10: v2(1040,805) 1095,805 1130,840 U9.8@1130,902.36
  Bottom Layer w10: DS3.a@834.25,495.27 834.25,599.25 v2(1040,805)
ADCINA0: CN1.31 JP2.2 U13.174 | length 2417.8
  Top Layer w10: CN1.31@3744.44,138 3744.44,102.56 3806,41 4260,41 4302,83 4302,308 4233,377 4233,928 JP2.2@4285,980
  Bottom Layer w10: U13.174@3492.13,1081.1 4183.9,1081.1 JP2.2@4285,980
ADCINA1: CN1.32 JP3.2 U13.173 | length 1832.6
  Top Layer w10: U13.173@3492.13,1181.1 3517.1,1181.1 3565,1229 3637,1229 3663,1203 v1(3663,882) 3663,342.56 3756,249.56 CN1.32@3744.44,238
  Bottom Layer w10: v1(3663,882) 4283,882 JP3.2@4285,880
ADCINA2: CN1.29 JP4.2 U13.172 | length 1963.7
  Top Layer w10: U13.172@3392.13,881.1 U13.172@3405.1,881.1 ; v1(3626,926) 3626,336 3632,330 3630,328 3687,271 3687,180.56 CN1.29@3644.44,138
  Bottom Layer w10: U13.172@3392.13,881.1 3435.6,924.58 4305.58,924.58 4333,952 4333,1032 JP4.2@4285,1080
ADCINA3: CN1.30 U13.171 | length 1043.7
  Top Layer w10: v1(3582,1029) 3582,313.56 3651,244.56 CN1.30@3644.44,238
  Bottom Layer w10: U13.171@3392.13,981.1 3392.13,1001.13 3420,1029 v1(3582,1029)
ADCINA4: CN1.27 U13.170 | length 1006.2
  Top Layer w10: U13.170@3392.13,1081.1 3441,1032.23 3441,825 3492,774 3492,190.44 CN1.27@3544.44,138
ADCINA5: CN1.28 U13.169 | length 1065.5
  Top Layer w10: U13.169@3392.13,1181.1 3392.13,1162.87 3425,1130 3524,1130 3546,1108 3546,256.12 3544.44,254.56 CN1.28@3544.44,238
ADCINA6: CN1.25 U13.168 | length 806.2
  Top Layer w10: U13.168@3292.13,881.1 3292.13,865.87 3396,762 3396,186.44 CN1.25@3444.44,138
ADCINA7: CN1.26 U13.167 | length 820.1
  Top Layer w10: U13.167@3292.13,981.1 3315.9,981.1 3341,956 3341,860 3444.44,756.56 CN1.26@3444.44,238
ADCINB0: CN1.35 U13.2 | length 1357.4
  Top Layer w10: U13.2@3879.53,1468.5 3893.72,1454.31 3893.72,188.72 CN1.35@3944.44,138
ADCINB1: CN1.36 U13.3 | length 1245
  Top Layer w10: CN1.36@3944.44,238 3944.44,1433.42 U13.3@3979.53,1468.5
ADCINB2: CN1.37 U13.4 | length 1351.2
  Top Layer w10: CN1.37@4044.44,138 4044.44,142.44 4087,185 4087,1461.03 U13.4@4079.53,1468.5
ADCINB3: CN1.38 U13.5 | length 1616.7
  Top Layer w10: U13.5@3779.53,1568.5 3779.53,1580.53 3808.03,1609.03 3917.97,1609.03 3929,1598 3929,1538 3945,1522 3998,1522 4030,1490 4030,252.44 CN1.38@4044.44,238
ADCINB4: CN1.39 U13.6 | length 1881
  Top Layer w8: U13.6@3879.53,1568.5 3832,1520.98 3832,1430 3804.91,1402.91 3804.91,108.09 3843,70 4087,70 4144.44,127.44 CN1.39@4144.44,138
ADCINB5: CN1.40 U13.7 | length 1560.5
  Top Layer w10: U13.7@3983.5,1568.5 U13.7@3979.53,1568.5 4020.05,1609.03 4114.97,1609.03 4144.44,1579.56 4144.44,1416.07 4119,1390.63 4119,263.44 CN1.40@4144.44,238
ADCINB6: CN1.41 U13.8 | length 1565.6
  Top Layer w10: U13.8@4079.53,1568.5 4127,1521.03 4127,1421.26 4103,1397.26 4103,205 4121,187 4201,187 4244.44,143.56 CN1.41@4244.44,138
ADCINB7: CN1.42 JP1.2 U13.9 | length 1996
  Top Layer w10: U13.9@3779.53,1668.5 3823,1625.03 4126.97,1625.03 4164,1588 4164,1410.26 4135,1381.26 4135,1179 ; v1(4156,1180) 4138,1180 4137,1181 4135,1179 ; CN1.42@4244.44,238 4211,238 4135,314 4135,1179
  Bottom Layer w10: v1(4156,1180) JP1.2@4285,1180
ADCREFM: C27.1 U13.10 | length 307.8
  Top Layer w10: v1@3655,1643 3683.5,1614.5 C27.1@3693,1614.5
  Bottom Layer w10: v1(3655,1642) 3680,1617 3831,1617 3879.53,1665.53 U13.10@3879.53,1668.5
ADCREFP: C28.1 U13.11 | length 601.1
  Top Layer w10: C28.1@3494,1501.5 3546.5,1501.5 v1@3556,1511
  Bottom Layer w10: v1@3554.44,1513 v1(3556,1513) 3902,1513 3936,1547 3936,1624.98 U13.11@3979.53,1668.5
ADCRESEXT: R19.2 U13.16 | length 575.2
  Top Layer w10: R19.2@3988,1360 v1@3988,1391 ; U13.16@4079.53,1768.5 4148,1700.03 v1@4148,1657
  Bottom Layer w10: v1(3989,1394) 4114,1394 4151,1431 v1(4151,1658)
AGND: C27.2 C28.2 C35.2 C36.2 C37.2 C38.2 C41.1 C42.1 C43.1 C44.1 C45.1 C46.1 C48.2 CN1.33 CN1.43 CN5.2 CN5.4 L5.2 R19.1 R31.2 R34.2 R38.1 U6.3 U8.4 U13.12 U13.15 U13.165 U13.175 U13.176 | length 620.3
  Top Layer w10: C37.2@3293,1343.5 C38.2@3353,1343.5 ; 3353,1402 C38.2@3353,1343.5 ; C35.2@3412.44,1343.5 C38.2@3353,1343.5 ; C27.2@3693,1677.5 3693,1759 3703,1769 v1(3711,1769) ; C44.1@4368.5,526.06 C44.1@4368.5,530 R31.2@4368.5,590 ; U8.4@4491.07,480 U8.4@4519.39,480 ; C43.1@4520,1241.5 C42.1@4585,1241.5 ; C46.1@4896.5,480 C45.1@4896.5,633.94 ; R38.1@5169.41,753.42 R38.1@5173.35,753.42
  Bottom Layer w10: CN1.43@4344.44,138 CN1.43@4368,138
  other v1: 3994,106 3891,130 3844,186 4661,261 4815,262 3987,420 4475,423 4528,431 4176,437 4300,519 3988,548 4173,559 4305,589 4284,715 4176,717 3987,767 4542,774 4718,774 4289,808 5119,814 5198,820 4175,830 3510,837 3478,838 3623,983 4169,989 3982,1013 3622,1015 4170,1045 3572,1180 3620,1181 3987,1228 3275,1237 3308,1237 3989,1260 3520,1273 3421,1500 3452,1539 4031,1673 3650,1677 4023,1755 3657,1767 3934,1767
AVDD1V8: C37.1 C38.1 L4.2 | length 125.6
  Top Layer w11.81: L4.2@3228,1282 3291.5,1282 C37.1@3293,1280.5 C38.1@3353,1280.5
AVDD3V3: C35.1 C36.1 CN1.34 CN1.44 L3.2 U13.1 U13.13 U13.14 U13.166 | length 3106
  Top Layer w15.75: U13.166@3292.13,1081.1 3306.1,1081.1 3343,1118 3343,1211 3367,1235 3415,1235 ; C35.1@3413,1280.5 3413,1237 3415,1235 ; v1@3552,1457 3552,1408.5 3549.5,1406 3560,1395.5 L3.2@3560,1342 3560,1253 3542,1235 3415,1235 ; v2(3727.44,1460.83) 3727.44,1716.42 U13.13@3779.53,1768.5 U13.14@3879.53,1768.5 ; CN1.34@3844.44,238 3851,244.56 v1(3851,1392)
  Bottom Layer w15.75: v1@3559,1460 3771.02,1460 U13.1@3779.53,1468.5 3851,1397.03 v1(3851,1392) ; CN1.34@3844.44,238 3893.44,189 4295.44,189 CN1.44@4344.44,238
  other v1: 3549,1460
B: DS3.b U9.9 | length 245.5
  Top Layer w10: U9.9@1130,697.64 1130,674 1150,654 1150,579.53 DS3.b@1234.25,495.28
C: DS3.c U9.11 | length 1169.7
  Top Layer w10: U9.11@1230,697.64 1230,652.12 1255,627.13 v2(1255,585)
  Bottom Layer w10: DS3.c@1034.25,95.27 1136.98,198 1357,198 1520,361 1520,520 1455,585 v2(1255,585)
CAN_H: CN7.2 R39.2 T2.1 U10.7 | length 485.3
  Top Layer w10: U10.7@5140.98,2716.8 5174.8,2716.8 5200.09,2742.09 R39.2@5250,2742.09 5447.78,2742.09 CN7.2@5497.33,2791.64
  Bottom Layer w10: T2.1@5399.33,2791.64 CN7.2@5497.33,2791.64
CAN_L: CN7.1 R39.1 T1.1 U10.6 | length 486
  Top Layer w10: U10.6@5140.98,2666.8 5166.2,2666.8 5205.09,2627.91 R39.1@5250,2627.91 5259.09,2637 5455.11,2637 CN7.1@5497.33,2594.79
  Bottom Layer w10: T1.1@5405,2595 CN7.1@5497.33,2594.79
CANRXA: JP6.8 U10.4 U13.89 | length 6355.6
  Top Layer w10: v1(2202,2687) 2202,2471.23 U13.89@2204.73,2468.5 ; U10.4@4915.98,2616.8 4915.98,2566.02 v1@4918,2564
  Bottom Layer w10: v1(2202,2687) 4009,2687 4029,2707 4821,2707 4843.5,2684.5 4846,2687 ; JP6.8@2739,3757 2739,3764 2788,3813 3047.89,3813 3056.89,3822 4791,3822 4847.19,3765.81 4847.19,2688.19 4846,2687 ; v1(4913,2562) 4913,2663 4889,2687 4846,2687
CANTXA: JP6.7 U10.1 U13.87 | length 3439
  Top Layer w8: v1(2540,3056) 2540,3511 2611,3582 2669,3582 2739,3652 JP6.7@2739,3657
  Top Layer w10: v2(4801.94,2766.8) U10.1@4915.98,2766.8
  Bottom Layer w8: 2516.61,2980.39 2540,3003.78 v1(2540,3056)
  Bottom Layer w10: U13.87@2492.13,2955.9 2516.61,2980.39 ; 2540,3003.78 2550.22,3014 4758,3014 4801.94,2970.06 v2(4801.94,2766.8)
D: DS3.d U9.12 | length 827.4
  Top Layer w10: DS3.d@834.25,95.27 1008.98,270 1078,270 1280,472 U9.12@1280,697.64
D1: DS3.com1 U9.1 | length 1122.3
  Top Layer w10: U9.1@1480,902.36 1480.83,901.54 1480.83,831.3 v2(1481.65,830.48)
  Bottom Layer w10: DS3.com1@734.25,495.28 734.25,704.25 910,880 1432.13,880 v2(1481.65,830.48)
D2: DS3.com2 U9.5 | length 584.7
  Top Layer w10: U9.5@1280,902.36 1280,830 v2(1315,795)
  Bottom Layer w10: DS3.com2@1034.25,495.27 1034.25,588.25 1245.25,799.25 1310.75,799.25 v2(1315,795)
D3: DS3.com3 U9.6 | length 482.8
  Top Layer w10: U9.6@1230,902.36 1230,820 v2(1273.56,776.44)
  Bottom Layer w10: DS3.com3@1134.25,495.27 1134.25,637.13 v2(1273.56,776.44)
D4: DS3.com4 U9.7 | length 1051.8
  Top Layer w10: U9.7@1180,902.36 1180,825 1254,751 1392,751 1405,738 1405,266.02 DS3.com4@1234.25,95.27